# Altium PCB DB36.PcbDoc (part 4 of 6)
Units mm, origin at the board's own origin, x right, y up, seen from the top; angles counter-clockwise.
Board outline 82.2 x 113.2 mm, 8 copper layers (Top Layer, MidLayer1, MidLayer2, GND, MidLayer3, VCC, MidLayer4, Bottom Layer), stack 1.57 mm thick; 185 components, 477 nets, 1727 pads, 1538 vias.
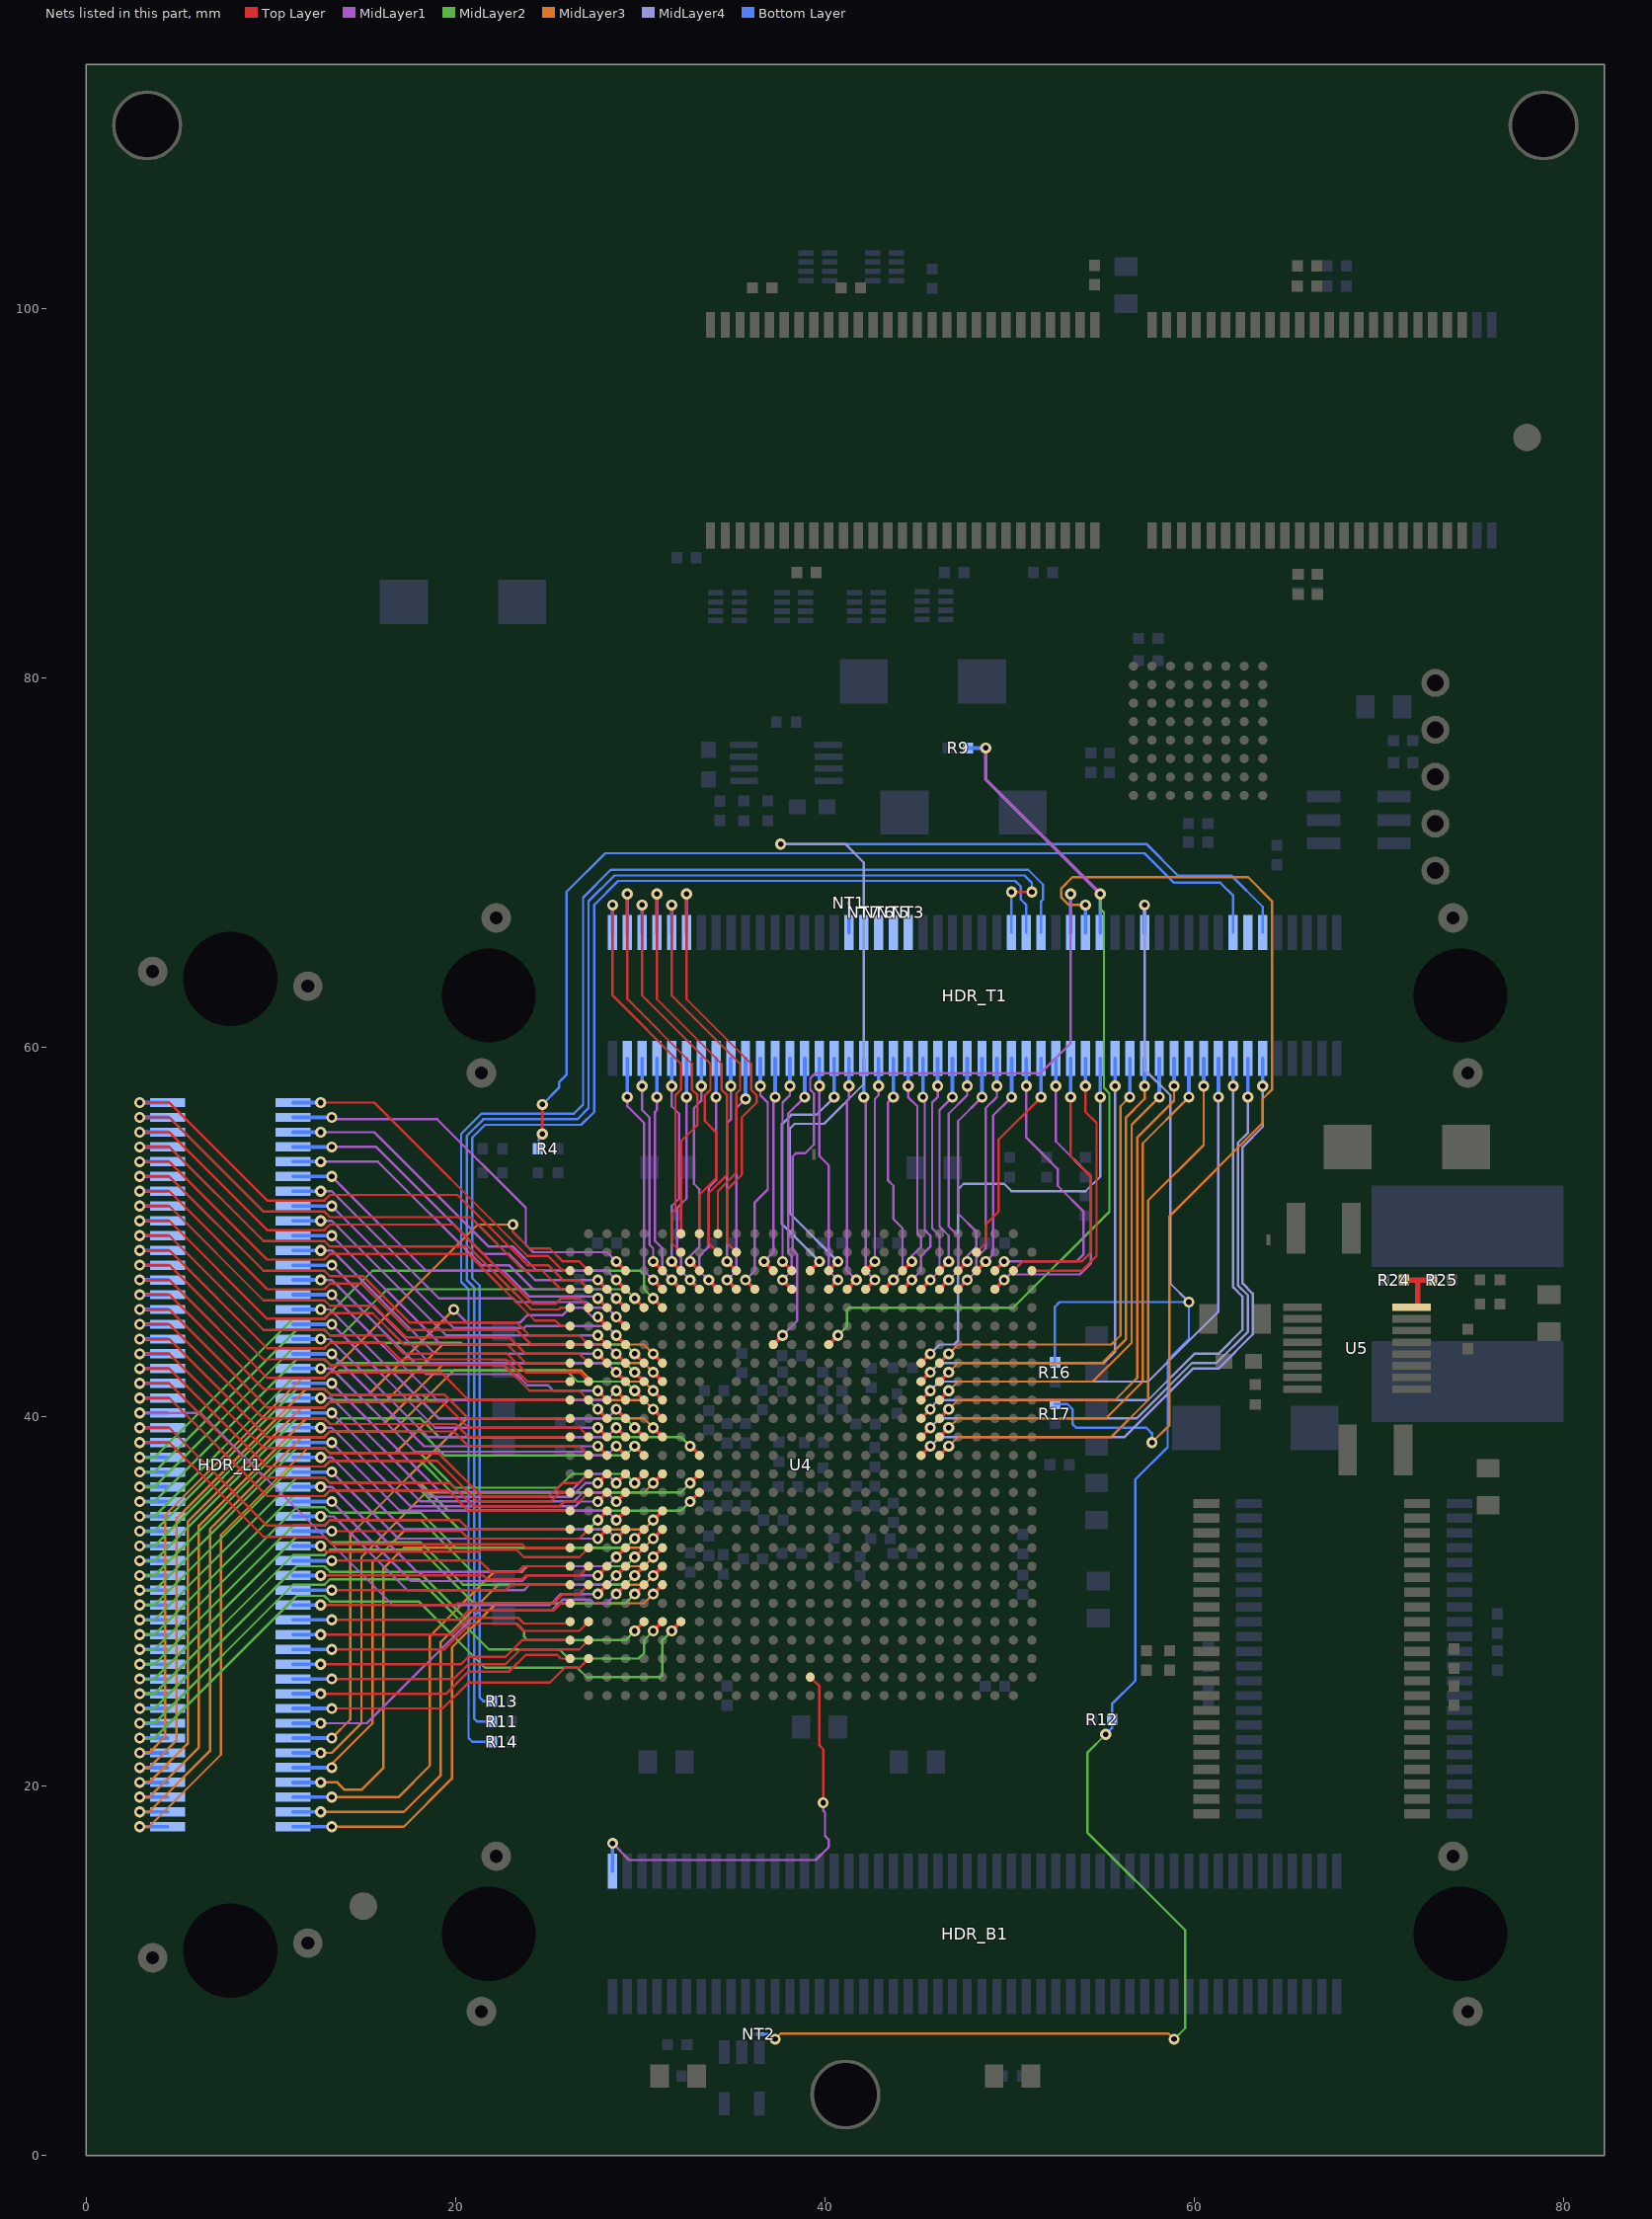
[diagram p10: the nets of this part, all layers, seen from the top]

## Via types
v1: diameter 0.6, hole 0.3, Top Layer to Bottom Layer, 904 vias
v2: diameter 0.6, hole 0.3, Top Layer to Bottom Layer, tented both sides, 506 vias
v3: diameter 0.7, hole 0.4, Top Layer to Bottom Layer, 127 vias
v4: diameter 0.6, hole 0.3, Top Layer to Bottom Layer, tented top, 1 vias

## Nets (pads, with @x,y where several pads share a name; then routed paths per layer and width w, separated by ;. In a path a pad name is that pad's centre, name@x,y a point inside that pad or via, vN(x,y) a via of type N, cw(c..) or ccw(c..) an arc to the next point about the centre after c; other vN are vias at no path point) (continued)
EXTEND_A0: HDR_L1.1 U4.D2 | length 30.2
  Top Layer w0.127: v2(2.9,57) 4.5,57 9.8,51.7 12.9,51.7 13.2,52 20.1,52 23.9,48.2 24.3,48.2 24.6,48.2 25,48.2 25.8,47.4 26.7,47.4 U4.D2@27.2,46.9
  Bottom Layer w0.2: v2(2.9,57) HDR_L1.1@4.4,57
EXTEND_A1: HDR_L1.3 U4.D1 | length 29.1
  Top Layer w0.127: v2(2.9,56.2) 3.9,56.2 ; 3.5,56.2 4.5,56.2 9.6,51.1 12.9,51.1 13.2,50.8 20.8,50.8 23.7,47.9 24.3,47.9 24.6,47.9 24.7,47.9 25.7,46.9 U4.D1@26.2,46.9
  Bottom Layer w0.2: v2(2.9,56.2) HDR_L1.3@4.4,56.2
EXTEND_A2: HDR_L1.5 U4.E2 | length 30.7
  Top Layer w0.127: v2(2.9,55.4) 4,55.4 ; 3.5,55.4 4.5,55.4 9.8,50.1 12.9,50.1 13.2,50.4 19.9,50.4 24.2,46.1 24.3,46.1 24.6,46.1 25.4,46.1 25.7,46.4 26.7,46.4 U4.E2@27.2,45.9
  Bottom Layer w0.2: v2(2.9,55.4) HDR_L1.5@4.4,55.4
EXTEND_A3: HDR_L1.7 U4.E1 | length 28.9
  Top Layer w0.127: v2(2.9,54.6) 3.9,54.6 ; 3.5,54.6 4.5,54.6 9.6,49.5 12.9,49.5 13.2,49.2 20.7,49.2 24.1,45.8 24.3,45.8 24.6,45.8 25.6,45.8 25.7,45.9 U4.E1@26.2,45.9
  Bottom Layer w0.2: v2(2.9,54.6) HDR_L1.7@4.4,54.6
EXTEND_A4: HDR_L1.9 U4.F1 | length 29
  Top Layer w0.127: v2(2.9,53.8) 3.8,53.8 ; 3.5,53.8 4.5,53.8 9.8,48.5 12.9,48.5 13.2,48.8 20.7,48.8 24.3,45.2 24.6,45.2 25.4,45.2 25.7,44.9 U4.F1@26.2,44.9
  Bottom Layer w0.2: v2(2.9,53.8) HDR_L1.9@4.4,53.8
EXTEND_A5: HDR_L1.11 U4.G2 | length 29.9
  Top Layer w0.127: v2(2.9,53) 3.8,53 ; 3.5,53 4.5,53 9.6,47.9 12.9,47.9 13.2,47.6 15,47.6 17.5,45.1 23.3,45.1 23.5,44.9 24,44.4 25.8,44.4 26.7,44.4 U4.G2@27.2,43.9
  Bottom Layer w0.2: v2(2.9,53) HDR_L1.11@4.4,53
EXTEND_A6: HDR_L1.13 U4.G1 | length 28.8
  Top Layer w0.127: v2(2.9,52.2) 3.8,52.2 ; 3.5,52.2 4.5,52.2 9.8,46.9 12.9,46.9 13.2,47.2 14.9,47.2 17.4,44.7 23.3,44.7 24.1,43.9 24.3,43.9 24.6,43.9 U4.G1@26.2,43.9
  Bottom Layer w0.2: v2(2.9,52.2) HDR_L1.13@4.4,52.2
EXTEND_A7: HDR_L1.15 U4.H2 | length 29.6
  Top Layer w0.127: v2(2.9,51.4) 3.8,51.4 ; 3.5,51.4 4.5,51.4 9.6,46.3 12.9,46.3 13.2,46 15.6,46 17.3,44.3 22.9,44.3 23.8,43.4 24.3,43.4 24.6,43.4 26.7,43.4 U4.H2@27.2,42.9
  Bottom Layer w0.2: v2(2.9,51.4) HDR_L1.15@4.4,51.4
EXTEND_A8: HDR_L1.17 U4.H1 | length 28.5
  Top Layer w0.127: v2(2.9,50.6) 3.8,50.6 ; 3.5,50.6 4.5,50.6 9.8,45.3 12.9,45.3 13.2,45.6 15.5,45.6 17.2,43.9 22.8,43.9 23.8,42.9 24.3,42.9 24.6,42.9 U4.H1@26.2,42.9
  Bottom Layer w0.2: v2(2.9,50.6) HDR_L1.17@4.4,50.6
EXTEND_A9: HDR_L1.19 U4.J2 | length 29.4
  Top Layer w0.127: v2(2.9,49.8) 3.8,49.8 ; 3.5,49.8 4.5,49.8 9.6,44.7 12.9,44.7 13.2,44.4 16.2,44.4 17.2,43.4 22.8,43.4 23.8,42.4 24.3,42.4 24.6,42.4 26.7,42.4 U4.J2@27.2,41.9
  Bottom Layer w0.2: v2(2.9,49.8) HDR_L1.19@4.4,49.8
EXTEND_A10: HDR_L1.21 U4.J1 | length 28.3
  Top Layer w0.127: v2(2.9,49) 3.8,49 ; 3.5,49 4.5,49 9.8,43.7 12.9,43.7 13.2,44 16.1,44 17,43.1 22.7,43.1 23.9,41.9 24.3,41.9 24.6,41.9 U4.J1@26.2,41.9
  Bottom Layer w0.2: v2(2.9,49) HDR_L1.21@4.4,49
EXTEND_A11: HDR_L1.23 U4.K2 | length 29.1
  Top Layer w0.127: v2(2.9,48.2) 3.8,48.2 ; 3.5,48.2 4.5,48.2 9.6,43.1 12.9,43.1 13.2,42.8 22.6,42.8 24,41.4 24.3,41.4 24.6,41.4 26.7,41.4 U4.K2@27.2,40.9
  Bottom Layer w0.2: v2(2.9,48.2) HDR_L1.23@4.4,48.2
EXTEND_A12: HDR_L1.25 U4.K1 | length 27.7
  Top Layer w0.127: v2(2.9,47.4) 4.5,47.4 9.8,42.1 12.9,42.1 13.2,42.4 19.2,42.4 20.7,40.9 24.3,40.9 24.6,40.9 U4.K1@26.2,40.9
  Bottom Layer w0.2: v2(2.9,47.4) HDR_L1.25@4.4,47.4
EXTEND_A13: HDR_L1.27 U4.L1 | length 27.6
  Top Layer w0.127: v2(2.9,46.6) 4.5,46.6 9.6,41.5 12.9,41.5 13.2,41.2 19.4,41.2 20.7,39.9 24.3,39.9 24.6,39.9 U4.L1@26.2,39.9
  Bottom Layer w0.2: v2(2.9,46.6) HDR_L1.27@4.4,46.6
EXTEND_A14: HDR_L1.29 U4.M2 | length 28.9
  Top Layer w0.127: v2(2.9,45.8) 4.5,45.8 9.8,40.5 12.9,40.5 13.2,40.8 19.3,40.8 20.7,39.4 24.3,39.4 24.6,39.4 26.7,39.4 U4.M2@27.2,38.9
  Bottom Layer w0.2: v2(2.9,45.8) HDR_L1.29@4.4,45.8
EXTEND_A15: HDR_L1.31 U4.M1 | length 27.3
  Top Layer w0.127: v2(2.9,45) 4.5,45 9.6,39.9 12.9,39.9 13.2,39.6 20,39.6 20.7,38.9 24.3,38.9 24.6,38.9 U4.M1@26.2,38.9
  Bottom Layer w0.2: v2(2.9,45) HDR_L1.31@4.4,45
EXTEND_A16: HDR_L1.33 U4.N2 | length 28.7
  Top Layer w0.127: v2(2.9,44.2) 4.5,44.2 9.8,38.9 12.9,38.9 13.2,39.2 19.9,39.2 20.7,38.4 24.3,38.4 24.6,38.4 26.7,38.4 U4.N2@27.2,37.9
  Bottom Layer w0.2: v2(2.9,44.2) HDR_L1.33@4.4,44.2
EXTEND_A17: HDR_L1.35 U4.P2 | length 29.5
  Top Layer w0.127: v2(2.9,43.4) 4.5,43.4 9.6,38.3 12.9,38.3 13.2,38 19.1,38 21.438,35.662 25.046,35.662 25.784,36.4 26.7,36.4 U4.P2@27.2,36.9
  Bottom Layer w0.2: v2(2.9,43.4) HDR_L1.35@4.4,43.4
EXTEND_A18: HDR_L1.37 U4.R1 | length 28.2
  Top Layer w0.127: v2(2.9,42.6) 4.5,42.6 9.8,37.3 12.9,37.3 13.2,37.6 19,37.6 20.7,35.9 21.192,35.408 25.151,35.408 25.643,35.9 U4.R1@26.2,35.9
  Bottom Layer w0.2: v2(2.9,42.6) HDR_L1.37@4.4,42.6
EXTEND_A19: HDR_L1.39 U4.R2 | length 28.9
  Top Layer w0.127: v2(2.9,41.8) 4.5,41.8 9.6,36.7 12.9,36.7 13.2,36.4 19.7,36.4 20.946,35.154 25.654,35.154 25.9,35.4 26.7,35.4 U4.R2@27.2,35.9
  Bottom Layer w0.2: v2(2.9,41.8) HDR_L1.39@4.4,41.8
EXTEND_A20: HDR_L1.41 U4.T1 | length 27.6
  Top Layer w0.127: v2(2.9,41) 4.5,41 9.8,35.7 12.9,35.7 13.2,36 19.6,36 20.7,34.9 24.3,34.9 24.6,34.9 U4.T1@26.2,34.9
  Bottom Layer w0.2: v2(2.9,41) HDR_L1.41@4.4,41
EXTEND_A21: HDR_L1.43 U4.Y3 | length 31.6
  Top Layer w0.2: v1(27.7,30.4) U4.Y3@28.2,30.9
  MidLayer1 w0.127: v2(2.9,40.2) 6.2,40.2 16.6,29.8 24.3,29.8 24.6,29.8 25.1,29.8 25.7,30.4 v1(27.7,30.4)
  Bottom Layer w0.2: v2(2.9,40.2) HDR_L1.43@4.4,40.2
EXTEND_A22: HDR_L1.45 U4.U1 | length 27.3
  Top Layer w0.127: v2(2.9,39.4) 4.5,39.4 9.8,34.1 12.9,34.1 13.2,34.4 20.2,34.4 20.7,33.9 24.3,33.9 24.6,33.9 U4.U1@26.2,33.9
  Bottom Layer w0.2: v2(2.9,39.4) HDR_L1.45@4.4,39.4
EXTEND_A23: HDR_L1.47 U4.V1 | length 27.5
  Top Layer w0.127: v2(2.9,38.6) 3.8,38.6 ; 3.5,38.6 4.5,38.6 9.6,33.5 12.9,33.5 13.3,33.1 23.6,33.1 23.8,32.9 24.3,32.9 24.6,32.9 U4.V1@26.2,32.9
  Bottom Layer w0.2: v2(2.9,38.6) HDR_L1.47@4.4,38.6
EXTEND_A24: HDR_L1.49 U4.E6 | length 35.3
  Top Layer w0.2: v1(30.7,46.4) U4.E6@31.2,45.9
  MidLayer2 w0.127: v2(2.9,37.8) 3.7,37.8 11.2,45.3 12.9,45.3 14,46.4 15.5,47.9 24.3,47.9 24.6,47.9 30,47.9 30.2,47.7 30.2,46.9 v1(30.7,46.4)
  Bottom Layer w0.2: v2(2.9,37.8) HDR_L1.49@4.4,37.8
EXTEND_A25: HDR_L1.51 U4.E5 | length 33.6
  Top Layer w0.2: v1(29.7,46.4) U4.E5@30.2,45.9
  MidLayer2 w0.127: v2(2.9,37) 3.7,37 11.4,44.7 12.9,44.7 13.2,44.4 13.8,44.4 15.4,46 16.3,46.9 24.3,46.9 24.6,46.9 29.2,46.9 v1(29.7,46.4)
  Bottom Layer w0.2: v2(2.9,37) HDR_L1.51@4.4,37
EXTEND_A26: HDR_L1.53 U4.H5 | length 32.5
  Top Layer w0.2: v1(29.7,43.4) U4.H5@30.2,42.9
  MidLayer2 w0.127: v2(2.9,36.2) 3.7,36.2 11.2,43.7 12.9,43.7 13.2,44 20.3,44 20.4,43.9 24.3,43.9 24.6,43.9 29.2,43.9 v1(29.7,43.4)
  Bottom Layer w0.2: v2(2.9,36.2) HDR_L1.53@4.4,36.2
EXTEND_A27: HDR_L1.55 U4.J5 | length 32.6
  Top Layer w0.2: v1(29.7,42.4) U4.J5@30.2,41.9
  MidLayer2 w0.127: v2(2.9,35.4) 3.7,35.4 11.4,43.1 12.9,43.1 13.2,42.8 13.5,42.8 13.6,42.9 24.3,42.9 24.6,42.9 29.2,42.9 v1(29.7,42.4)
  Bottom Layer w0.2: v2(2.9,35.4) HDR_L1.55@4.4,35.4
EXTEND_A28: HDR_L1.57 U4.K5 | length 32.7
  Top Layer w0.2: v1(29.7,41.4) U4.K5@30.2,40.9
  MidLayer2 w0.127: v2(2.9,34.6) 3.7,34.6 11.2,42.1 12.9,42.1 13.2,42.4 13.6,42.4 13.7,42.5 24.3,42.5 24.6,42.5 26,42.5 26.6,41.9 29.2,41.9 v1(29.7,41.4)
  Bottom Layer w0.2: v2(2.9,34.6) HDR_L1.57@4.4,34.6
EXTEND_A29: HDR_L1.59 U4.L3 | length 30.8
  Top Layer w0.2: v1(27.7,40.4) U4.L3@28.2,39.9
  MidLayer2 w0.127: v2(2.9,33.8) 3.7,33.8 11.4,41.5 12.9,41.5 13.2,41.2 18.2,41.2 18.5,40.9 24.3,40.9 24.6,40.9 27.2,40.9 v1(27.7,40.4)
  Bottom Layer w0.2: v2(2.9,33.8) HDR_L1.59@4.4,33.8
  Bottom Layer w0.381: v1(27.7,40.4) v1@27.7,40.508
EXTEND_A30: HDR_L1.61 U4.M5 | length 32.9
  Top Layer w0.2: v1(29.7,39.4) U4.M5@30.2,38.9
  MidLayer2 w0.127: v2(2.9,33) 3.7,33 11.2,40.5 12.9,40.5 13.3,40.9 18.1,40.9 19.1,39.9 24.3,39.9 24.6,39.9 29.2,39.9 v1(29.7,39.4)
  Bottom Layer w0.2: v2(2.9,33) HDR_L1.61@4.4,33
EXTEND_A31: HDR_L1.63 U4.N8 | length 36.1
  Top Layer w0.2: v1@32.7,38.475 32.737,38.432 U4.N8@33.2,37.9
  MidLayer2 w0.127: v2(2.9,32.2) 3.7,32.2 11.4,39.9 12.9,39.9 13.2,39.6 13.5,39.6 13.8,39.9 18.1,39.9 19.1,38.9 24.3,38.9 24.6,38.9 32.2,38.9 v1(32.7,38.4)
  Bottom Layer w0.2: v2(2.9,32.2) HDR_L1.63@4.4,32.2
EXTEND_A32: HDR_L1.65 U4.N5 | length 33
  Top Layer w0.2: v1(29.7,38.4) U4.N5@30.2,37.9
  MidLayer2 w0.127: v2(2.9,31.4) 3.7,31.4 11.2,38.9 12.9,38.9 13.2,39.2 18.1,39.2 19.4,37.9 24.3,37.9 24.6,37.9 29.2,37.9 v1(29.7,38.4)
  Bottom Layer w0.2: v2(2.9,31.4) HDR_L1.65@4.4,31.4
EXTEND_A33: HDR_L1.67 U4.P5 | length 33.6
  Top Layer w0.2: v1(29.7,36.4) U4.P5@30.2,36.9
  MidLayer2 w0.127: v2(2.9,30.6) 3.7,30.6 11.4,38.3 12.9,38.3 13.2,38 18.1,38 19.946,36.154 25.554,36.154 26.3,36.9 29.2,36.9 v1(29.7,36.4)
  Bottom Layer w0.2: v2(2.9,30.6) HDR_L1.67@4.4,30.6
EXTEND_A34: HDR_L1.69 U4.P8 | length 36.1
  Top Layer w0.2: v1(32.7,36.4) U4.P8@33.2,36.9
  MidLayer2 w0.127: v2(2.9,29.8) 3.7,29.8 11.2,37.3 12.9,37.3 13.2,37.6 18.1,37.6 19.8,35.9 24.3,35.9 24.6,35.9 32.2,35.9 v1(32.7,36.4)
  Bottom Layer w0.2: v2(2.9,29.8) HDR_L1.69@4.4,29.8
EXTEND_A35: HDR_L1.71 U4.R8 | length 36.1
  Top Layer w0.2: v1(32.7,35.4) U4.R8@33.2,35.9
  MidLayer2 w0.127: v2(2.9,29) 3.7,29 11.4,36.7 12.9,36.7 13.2,36.4 18.1,36.4 19.6,34.9 24.3,34.9 24.6,34.9 32.2,34.9 v1(32.7,35.4)
  Bottom Layer w0.2: v2(2.9,29) HDR_L1.71@4.4,29
EXTEND_A36: HDR_L1.73 U4.T3 | length 31.4
  Top Layer w0.2: v1(27.7,34.4) U4.T3@28.2,34.9
  MidLayer2 w0.127: v2(2.9,28.2) 3.7,28.2 11.2,35.7 12.9,35.7 13.2,36 18.1,36 20.2,33.9 24.3,33.9 24.6,33.9 27.2,33.9 v1(27.7,34.4)
  Bottom Layer w0.2: v2(2.9,28.2) HDR_L1.73@4.4,28.2
  Bottom Layer w0.381: v1(27.7,34.4) v1@27.7,34.508
EXTEND_A37: HDR_L1.75 U4.U5 | length 33.3
  Top Layer w0.2: v1(29.7,33.4) U4.U5@30.2,33.9
  MidLayer2 w0.127: v2(2.9,27.4) 3.7,27.4 11.4,35.1 12.9,35.1 13.2,34.8 18.1,34.8 20,32.9 24.3,32.9 24.6,32.9 29.2,32.9 v1(29.7,33.4)
  Bottom Layer w0.2: v2(2.9,27.4) HDR_L1.75@4.4,27.4
EXTEND_A38: HDR_L1.77 U4.V5 | length 33.7
  Top Layer w0.2: v1(29.7,32.4) U4.V5@30.2,32.9
  MidLayer2 w0.127: v2(2.9,26.6) 3.7,26.6 11.2,34.1 12.9,34.1 13.2,34.4 18.1,34.4 20.9,31.6 23.4,31.6 23.7,31.9 24.3,31.9 24.6,31.9 29.2,31.9 v1(29.7,32.4)
  Bottom Layer w0.2: v2(2.9,26.6) HDR_L1.77@4.4,26.6
EXTEND_A39: HDR_L1.79 U4.W5 | length 33.5
  Top Layer w0.2: v1(29.7,31.4) U4.W5@30.2,31.9
  MidLayer2 w0.127: v2(2.9,25.8) 3.7,25.8 11.4,33.5 12.9,33.5 13.2,33.2 18.1,33.2 20.4,30.9 24.3,30.9 24.6,30.9 29.2,30.9 v1(29.7,31.4)
  Bottom Layer w0.2: v2(2.9,25.8) HDR_L1.79@4.4,25.8
EXTEND_A40: HDR_L1.81 U4.Y5 | length 33.6
  Top Layer w0.2: v1(29.7,30.4) U4.Y5@30.2,30.9
  MidLayer2 w0.127: v2(2.9,25) 3.7,25 11.2,32.5 12.9,32.5 13.2,32.8 18.1,32.8 21,29.9 24.3,29.9 24.6,29.9 29.2,29.9 v1(29.7,30.4)
  Bottom Layer w0.2: v2(2.9,25) HDR_L1.81@4.4,25
EXTEND_A41: HDR_L1.83 U4.AB5 | length 34.2
  Top Layer w0.2: v1(29.7,28.4) U4.AB5@30.2,28.9
  MidLayer2 w0.127: v2(2.9,24.2) 3.7,24.2 11.4,31.9 12.9,31.9 13.2,31.6 18,31.6 20.8,28.8 23.3,28.8 23.7,28.4 23.7,28.1 23.9,27.9 24.3,27.9 24.6,27.9 29.2,27.9 v1(29.7,28.4)
  Bottom Layer w0.2: v2(2.9,24.2) HDR_L1.83@4.4,24.2
EXTEND_A42: HDR_L1.85 U4.AB6 | length 36.1
  Top Layer w0.2: v1(30.7,28.4) U4.AB6@31.2,28.9
  MidLayer2 w0.127: v2(2.9,23.4) 3.7,23.4 11.2,30.9 12.9,30.9 13.2,31.2 18,31.2 21.8,27.4 24.3,27.4 24.6,27.4 25.625,27.4 26.125,26.9 29.9,26.9 30.2,27.2 30.2,27.9 v1(30.7,28.4)
  Bottom Layer w0.2: v2(2.9,23.4) HDR_L1.85@4.4,23.4
EXTEND_A43: HDR_L1.87 U4.AB7 | length 38.2
  Top Layer w0.2: v1(31.7,28.4) U4.AB7@32.2,28.9
  MidLayer2 w0.127: v2(2.9,22.6) 3.7,22.6 11.4,30.3 12.9,30.3 13.2,30 18,30 21.6,26.4 24.3,26.4 24.6,26.4 26.6,26.4 27.1,25.9 31.1,25.9 31.2,26 31.2,27.9 v1(31.7,28.4)
  Bottom Layer w0.2: v2(2.9,22.6) HDR_L1.87@4.4,22.6
EXTEND_A44: HDR_L1.89 U4.C2 | length 45.9
  Top Layer w0.127: v1(23.1,50.4) 23.1,50 24,49.1 24.3,49.1 24.6,49.1 25.1,49.1 25.8,48.4 26.7,48.4 U4.C2@27.2,47.9
  MidLayer3 w0.127: v2(2.9,21.8) 3.4,21.8 4.277,22.677 4.277,34.677 11.7,42.1 12.9,42.1 21.2,50.4 v1(23.1,50.4)
  Bottom Layer w0.2: v2(2.9,21.8) HDR_L1.89@4.4,21.8
EXTEND_A45: HDR_L1.91 U4.F3 | length 45.4
  Top Layer w0.2: v1(27.7,45.4) U4.F3@28.2,44.9
  MidLayer1 w0.127: v1(19.9,45.8) 20.6,45.1 23.5,45.1 23.9,45.5 24.3,45.5 24.6,45.5 25.8,45.5 26.2,45.9 26.9,45.9 27.4,45.4 v1(27.7,45.4)
  MidLayer3 w0.127: v2(2.9,21) 3.4,21 4.9,22.5 4.9,34.5 11.9,41.5 12.9,41.5 13.2,41.2 15.3,41.2 v1(19.9,45.8)
  Bottom Layer w0.2: v2(2.9,21) HDR_L1.91@4.4,21
EXTEND_A46: HDR_L1.93 U4.H6 | length 47.1
  Top Layer w0.2: v1(30.7,43.4) U4.H6@31.2,42.9
  MidLayer3 w0.127: v2(2.9,20.2) 3.4,20.2 5.5,22.3 5.5,34.3 11.7,40.5 12.9,40.5 13.2,40.8 16.2,40.8 19.3,43.9 24.3,43.9 24.6,43.9 30.2,43.9 v1(30.7,43.4)
  Bottom Layer w0.2: v2(2.9,20.2) HDR_L1.93@4.4,20.2
EXTEND_A47: HDR_L1.95 U4.J6 | length 47.2
  Top Layer w0.2: v1(30.7,42.4) U4.J6@31.2,41.9
  MidLayer3 w0.127: v2(2.9,19.4) 3.4,19.4 6.1,22.1 6.1,34.1 11.9,39.9 12.9,39.9 13.2,39.6 16.1,39.6 19.4,42.9 24.3,42.9 24.6,42.9 30.2,42.9 v1(30.7,42.4)
  Bottom Layer w0.2: v2@2.9,19.4 HDR_L1.95@4.4,19.4
EXTEND_A48: HDR_L1.97 U4.K6 | length 47.4
  Top Layer w0.2: v1(30.7,41.4) U4.K6@31.2,40.9
  MidLayer3 w0.127: v2(2.9,18.6) 3.4,18.6 6.7,21.9 6.7,33.9 11.7,38.9 12.912,38.9 12.912,38.912 13.2,39.2 16.6,39.2 19.9,42.5 24.3,42.5 24.6,42.5 26.8,42.5 27.4,41.9 30.2,41.9 v1(30.7,41.4)
  Bottom Layer w0.2: v2(2.9,18.6) HDR_L1.97@4.4,18.6
EXTEND_A49: HDR_L1.99 U4.L6 | length 47
  Top Layer w0.2: v1(30.7,40.4) U4.L6@31.2,39.9
  MidLayer3 w0.127: v2(2.9,17.8) 3.4,17.8 7.3,21.7 7.3,33.6 12,38.3 12.9,38.3 13.2,38 16.7,38 19.6,40.9 24.3,40.9 24.6,40.9 30.2,40.9 v1(30.7,40.4)
  Bottom Layer w0.2: v2(2.9,17.8) HDR_L1.99@4.4,17.8
EXTEND_B0: HDR_L1.2 U4.C1 | length 18.8
  Top Layer w0.127: v2(12.7,57) 15.6,57 23.9,48.7 24.3,48.7 24.6,48.7 25,48.7 25.8,47.9 U4.C1@26.2,47.9
  Bottom Layer w0.2: HDR_L1.2@11.2,57 v2(12.7,57)
EXTEND_B1: HDR_L1.4 U4.C4 | length 22.6
  Top Layer w0.2: v1(28.7,48.4) U4.C4@29.2,47.9
  MidLayer1 w0.127: v2(13.3,56.2) 13.4,56.2 13.5,56.1 19,56.1 23.8,51.3 23.8,49.3 24.2,48.9 28.2,48.9 v1(28.7,48.4)
  Bottom Layer w0.2: HDR_L1.4@11.2,56.2 v2(13.3,56.2)
EXTEND_B2: HDR_L1.6 U4.D4 | length 21.5
  Top Layer w0.2: v1(28.7,47.4) U4.D4@29.2,46.9
  MidLayer1 w0.127: v2(12.7,55.4) 15.6,55.4 21.8,49.2 23.1,49.2 24.4,47.9 28.2,47.9 v1(28.7,47.4)
  Bottom Layer w0.2: HDR_L1.6@11.2,55.4 v2(12.7,55.4)
EXTEND_B3: HDR_L1.8 U4.D3 | length 20.2
  Top Layer w0.2: v1(27.7,47.4) U4.D3@28.2,46.9
  MidLayer1 w0.127: v2(13.3,54.6) 15.7,54.6 21.5,48.8 22.9,48.8 24.3,47.4 v1(27.7,47.4)
  Bottom Layer w0.2: HDR_L1.8@11.2,54.6 v2(13.3,54.6)
EXTEND_B4: HDR_L1.10 U4.E4 | length 21.3
  Top Layer w0.2: v1(28.7,46.4) U4.E4@29.2,45.9
  MidLayer1 w0.127: v2(12.7,53.8) 15.8,53.8 21.4,48.2 22.9,48.2 24.2,46.9 28.2,46.9 v1(28.7,46.4)
  Bottom Layer w0.2: HDR_L1.10@11.2,53.8 v2(12.7,53.8)
EXTEND_B5: HDR_L1.12 U4.E3 | length 19.9
  Top Layer w0.2: v1(27.7,46.4) U4.E3@28.2,45.9
  MidLayer1 w0.127: v2(13.3,53) 18.4,47.9 22.6,47.9 24,46.5 27.6,46.5 v1(27.7,46.4)
  Bottom Layer w0.2: HDR_L1.12@11.2,53 v2(13.3,53)
EXTEND_B6: HDR_L1.14 U4.F4 | length 21
  Top Layer w0.2: v1(28.7,45.4) U4.F4@29.2,44.9
  MidLayer1 w0.127: v2(12.7,52.2) 13.3,52.2 19.1,46.4 23.1,46.4 23.3,46.2 24.3,46.2 24.6,46.2 27.1,46.2 27.4,45.9 28.2,45.9 v1(28.7,45.4)
  Bottom Layer w0.2: HDR_L1.14@11.2,52.2 v2(12.7,52.2)
EXTEND_B7: HDR_L1.16 U4.G4 | length 21.2
  Top Layer w0.2: v1(28.7,44.4) U4.G4@29.2,43.9
  MidLayer1 w0.127: v2(13.3,51.4) 19.9,44.8 23.7,44.8 23.8,44.9 24.3,44.9 24.6,44.9 28.2,44.9 v1(28.7,44.4)
  Bottom Layer w0.2: HDR_L1.16@11.2,51.4 v2(13.3,51.4)
EXTEND_B8: HDR_L1.18 U4.G3 | length 19.8
  Top Layer w0.127: v1(27.7,44.4) U4.G3@28.2,43.9
  MidLayer1 w0.127: v2(12.7,50.6) 13.3,50.6 19.5,44.4 24.3,44.4 24.6,44.4 v1(27.7,44.4)
  Bottom Layer w0.2: HDR_L1.18@11.2,50.6 v2(12.7,50.6)
EXTEND_B9: HDR_L1.20 U4.H4 | length 23.8
  Top Layer w0.2: v1(28.7,43.4) U4.H4@29.2,42.9
  MidLayer1 w0.127: v2(13.3,49.8) 19.2,43.9 24.3,43.9 24.6,43.9 28.2,43.9 ; 25.3,43.9 28.2,43.9 ; v1(28.7,43.4) 28.2,43.9
  Bottom Layer w0.2: HDR_L1.20@11.2,49.8 v2(13.3,49.8)
EXTEND_B10: HDR_L1.22 U4.H3 | length 19.5
  Top Layer w0.2: v1(27.7,43.4) U4.H3@28.2,42.9
  MidLayer1 w0.127: v2(12.7,49) 13.3,49 18.9,43.4 24.3,43.4 24.6,43.4 v1(27.7,43.4)
  Bottom Layer w0.2: HDR_L1.22@11.2,49 v2(12.7,49)
EXTEND_B11: HDR_L1.24 U4.J4 | length 20.6
  Top Layer w0.2: v1(28.7,42.4) U4.J4@29.2,41.9
  MidLayer1 w0.127: v2(13.3,48.2) 18.6,42.9 24.3,42.9 24.6,42.9 28.2,42.9 v1(28.7,42.4)
  Bottom Layer w0.2: HDR_L1.24@11.2,48.2 v2(13.3,48.2)
EXTEND_B12: HDR_L1.26 U4.K3 | length 19.7
  Top Layer w0.2: v1(27.7,41.4) U4.K3@28.2,40.9
  MidLayer1 w0.127: v2(12.7,47.4) 13.3,47.4 18.4,42.3 23.3,42.3 23.9,41.7 24.3,41.7 24.6,41.7 25,41.7 25.3,41.4 v1(27.7,41.4)
  Bottom Layer w0.2: HDR_L1.26@11.2,47.4 v2(12.7,47.4)
EXTEND_B13: HDR_L1.28 U4.K4 | length 20.8
  Top Layer w0.2: v1(28.7,41.4) U4.K4@29.2,40.9
  MidLayer1 w0.127: v2(13.3,46.6) 19,40.9 24.3,40.9 24.6,40.9 25.3,40.9 28.2,40.9 v1(28.7,41.4)
  Bottom Layer w0.2: HDR_L1.28@11.2,46.6 v2(13.3,46.6)
EXTEND_B14: HDR_L1.30 U4.L4 | length 20.9
  Top Layer w0.2: v1(28.7,40.4) U4.L4@29.2,39.9
  MidLayer1 w0.127: v2(12.7,45.8) 13.2,45.8 19.1,39.9 24.3,39.9 24.6,39.9 28.2,39.9 v1(28.7,40.4)
  Bottom Layer w0.2: HDR_L1.30@11.2,45.8 v2(12.7,45.8)
EXTEND_B15: HDR_L1.32 U4.M3 | length 19.5
  Top Layer w0.2: v1(27.7,39.4) U4.M3@28.2,38.9
  MidLayer1 w0.127: v2(13.3,45) 18.9,39.4 24.3,39.4 24.6,39.4 v1(27.7,39.4)
  Bottom Layer w0.2: HDR_L1.32@11.2,45 v2(13.3,45)
EXTEND_B16: HDR_L1.34 U4.M4 | length 20.6
  Top Layer w0.2: v1(28.7,39.4) U4.M4@29.2,38.9
  MidLayer1 w0.127: v2(12.7,44.2) 13.2,44.2 18.5,38.9 24.3,38.9 24.6,38.9 28.2,38.9 v1(28.7,39.4)
  Bottom Layer w0.2: HDR_L1.34@11.2,44.2 v2(12.7,44.2)
EXTEND_B17: HDR_L1.36 U4.N3 | length 19.3
  Top Layer w0.2: v1(27.7,38.4) U4.N3@28.2,37.9
  MidLayer1 w0.127: v2(13.3,43.4) 18.3,38.4 24.3,38.4 24.6,38.4 v1(27.7,38.4)
  Bottom Layer w0.2: HDR_L1.36@11.2,43.4 v2(13.3,43.4)
EXTEND_B18: HDR_L1.38 U4.N4 | length 20.4
  Top Layer w0.2: v1(28.7,38.4) U4.N4@29.2,37.9
  MidLayer1 w0.127: v2(12.7,42.6) 13.3,42.6 17.8,38.1 24.3,38.1 24.6,38.1 27.2,38.1 27.4,37.9 28.2,37.9 v1(28.7,38.4)
  Bottom Layer w0.2: HDR_L1.38@11.2,42.6 v2(12.7,42.6)
EXTEND_B19: HDR_L1.40 U4.P4 | length 21.3
  Top Layer w0.2: v1(28.7,36.4) U4.P4@29.2,36.9
  MidLayer1 w0.127: v2(13.3,41.8) 19.184,35.916 26.184,35.916 27.168,36.9 28.2,36.9 v1(28.7,36.4)
  Bottom Layer w0.2: HDR_L1.40@11.2,41.8 v2(13.3,41.8)
EXTEND_B20: HDR_L1.42 U4.P3 | length 19.7
  Top Layer w0.2: v1(27.7,36.4) U4.P3@28.2,36.9
  MidLayer1 w0.127: v2(12.7,41) 13.3,41 18.638,35.662 26.29,35.662 27.027,36.4 v1(27.7,36.4)
  Bottom Layer w0.2: HDR_L1.42@11.2,41 v2(12.7,41)
EXTEND_B21: HDR_L1.44 U4.R4 | length 20.6
  Top Layer w0.2: v1(28.7,35.4) U4.R4@29.2,35.9
  MidLayer1 w0.127: v2(13.3,40.2) 18.092,35.408 26.395,35.408 26.887,35.9 28.2,35.9 v1(28.7,35.4)
  Bottom Layer w0.2: HDR_L1.44@11.2,40.2 v2(13.3,40.2)
EXTEND_B22: HDR_L1.46 U4.R3 | length 19.1
  Top Layer w0.2: v1(27.7,35.4) U4.R3@28.2,35.9
  MidLayer1 w0.127: v2(12.7,39.4) 13.3,39.4 17.546,35.154 26.5,35.154 26.746,35.4 v1(27.7,35.4)
  Bottom Layer w0.2: HDR_L1.46@11.2,39.4 v2(12.7,39.4)
EXTEND_B23: HDR_L1.48 U4.T4 | length 19.9
  Top Layer w0.2: v1(28.7,34.4) U4.T4@29.2,34.9
  MidLayer1 w0.127: v2(13.3,38.6) 17,34.9 24.3,34.9 24.6,34.9 28.2,34.9 v1(28.7,34.4)
  Bottom Layer w0.2: HDR_L1.48@11.2,38.6 v2(13.3,38.6)
EXTEND_B24: HDR_L1.50 U4.U4 | length 20
  Top Layer w0.2: v1(28.7,33.4) U4.U4@29.2,33.9
  MidLayer1 w0.127: v2(12.7,37.8) 13.3,37.8 17.2,33.9 24.3,33.9 24.6,33.9 25.3,33.9 28.2,33.9 v1(28.7,33.4)
  Bottom Layer w0.2: HDR_L1.50@11.2,37.8 v2(12.7,37.8)
EXTEND_B25: HDR_L1.52 U4.U3 | length 18.7
  Top Layer w0.2: v1(27.7,33.4) U4.U3@28.2,33.9
  MidLayer1 w0.127: v2(13.3,37) 16.9,33.4 24.3,33.4 24.6,33.4 25.3,33.4 v1(27.7,33.4)
  Bottom Layer w0.2: HDR_L1.52@11.2,37 v2(13.3,37)
EXTEND_B26: HDR_L1.54 U4.V4 | length 20.4
  Top Layer w0.2: v1(28.7,32.4) U4.V4@29.2,32.9
  MidLayer1 w0.127: v2(12.7,36.2) 13.3,36.2 17.9,31.6 23.5,31.6 23.8,31.9 24.3,31.9 24.6,31.9 28.2,31.9 v1(28.7,32.4)
  Bottom Layer w0.2: HDR_L1.54@11.2,36.2 v2(12.7,36.2)
EXTEND_B27: HDR_L1.56 U4.W3 | length 19.1
  Top Layer w0.2: v1(27.7,31.4) U4.W3@28.2,31.9
  MidLayer1 w0.127: v2(13.3,35.4) 17.6,31.1 23.6,31.1 23.9,31.4 24.3,31.4 24.6,31.4 v1(27.7,31.4)
  Bottom Layer w0.2: HDR_L1.56@11.2,35.4 v2(13.3,35.4)
EXTEND_B28: HDR_L1.58 U4.W4 | length 23.1
  Top Layer w0.2: v1(28.7,31.4) U4.W4@29.2,31.9
  MidLayer1 w0.127: v2(12.7,34.6) 13.4,34.6 17.4,30.6 23.7,30.6 24,30.9 24.3,30.9 24.6,30.9 28.2,30.9 ; 25.3,30.9 28.2,30.9 ; v1(28.7,31.4) 28.2,30.9
  Bottom Layer w0.2: HDR_L1.58@11.2,34.6 v2(12.7,34.6)
EXTEND_B29: HDR_L1.60 U4.U2 | length 16.4
  Top Layer w0.127: v2(13.3,33.8) 20.3,33.8 20.7,33.4 24.3,33.4 24.6,33.4 26.7,33.4 U4.U2@27.2,33.9
  Bottom Layer w0.2: HDR_L1.60@11.2,33.8 v2(13.3,33.8)
EXTEND_B30: HDR_L1.62 U4.V2 | length 16.5
  Top Layer w0.127: v2(12.7,33) 13,32.7 21.3,32.7 21.4,32.8 23.3,32.8 23.7,32.4 24.3,32.4 24.6,32.4 26.7,32.4 U4.V2@27.2,32.9
  Bottom Layer w0.2: HDR_L1.62@11.2,33 v2(12.7,33)
EXTEND_B31: HDR_L1.64 U4.W1 | length 15.4
  Top Layer w0.127: v2(13.3,32.2) 21.3,32.2 21.9,31.6 23.4,31.6 23.7,31.9 24.3,31.9 24.6,31.9 U4.W1@26.2,31.9
  Bottom Layer w0.2: HDR_L1.64@11.2,32.2 v2(13.3,32.2)
EXTEND_B32: HDR_L1.66 U4.W2 | length 16.4
  Top Layer w0.127: v2(12.7,31.4) 21.5,31.4 21.7,31.2 23.6,31.2 23.8,31.4 24.3,31.4 24.6,31.4 26.7,31.4 U4.W2@27.2,31.9
  Bottom Layer w0.2: HDR_L1.66@11.2,31.4 v2(12.7,31.4)
EXTEND_B33: HDR_L1.68 U4.Y1 | length 15.1
  Top Layer w0.127: v2(13.3,30.6) 22.7,30.6 23,30.9 24.3,30.9 24.6,30.9 U4.Y1@26.2,30.9
  Bottom Layer w0.2: HDR_L1.68@11.2,30.6 v2(13.3,30.6)
EXTEND_B34: HDR_L1.70 U4.Y2 | length 16.5
  Top Layer w0.127: v2(12.7,29.8) 20,29.8 20.1,29.9 24.3,29.9 24.6,29.9 25.3,29.9 25.8,30.4 26.7,30.4 U4.Y2@27.2,30.9
  Bottom Layer w0.2: HDR_L1.70@11.2,29.8 v2(12.7,29.8)
EXTEND_B35: HDR_L1.72 U4.AA1 | length 15.4
  Top Layer w0.127: v2(13.3,29) 20.2,29 20.7,29.5 24.3,29.5 24.6,29.5 25.3,29.5 25.7,29.9 U4.AA1@26.2,29.9
  Bottom Layer w0.2: HDR_L1.72@11.2,29 v2(13.3,29)
EXTEND_B36: HDR_L1.74 U4.AB1 | length 15.5
  Top Layer w0.127: v2(12.7,28.2) 19.8,28.2 20.7,29.1 23.4,29.1 23.7,28.8 24.3,28.8 24.6,28.8 26.1,28.8 U4.AB1@26.2,28.9
  Bottom Layer w0.2: HDR_L1.74@11.2,28.2 v2(12.7,28.2)
EXTEND_B37: HDR_L1.76 U4.AB2 | length 17
  Top Layer w0.127: v2(13.3,27.4) 19.4,27.4 20.8,28.8 23.3,28.8 23.7,28.4 24.3,28.4 24.6,28.4 25.7,28.4 26.7,28.4 U4.AB2@27.2,28.9
  Bottom Layer w0.2: HDR_L1.76@11.2,27.4 v2(13.3,27.4)
EXTEND_B38: HDR_L1.78 U4.AC1 | length 15.5
  Top Layer w0.127: v2(12.7,26.6) 20.3,26.6 20.7,27 22.7,27 23.6,27.9 24.3,27.9 24.6,27.9 U4.AC1@26.2,27.9
  Bottom Layer w0.2: HDR_L1.78@11.2,26.6 v2(12.7,26.6)
EXTEND_B39: HDR_L1.80 U4.AC2 | length 16.9
  Top Layer w0.127: v2(13.3,25.8) 19.9,25.8 20.7,26.6 22.7,26.6 23.5,27.4 24.3,27.4 24.6,27.4 26.7,27.4 U4.AC2@27.2,27.9
  Bottom Layer w0.2: HDR_L1.80@11.2,25.8 v2(13.3,25.8)
EXTEND_B40: HDR_L1.82 U4.AD1 | length 16
  Top Layer w0.127: v2(12.7,25) 19.5,25 20.7,26.2 22.9,26.2 23.8,27.1 24.3,27.1 24.6,27.1 25.5,27.1 25.7,26.9 U4.AD1@26.2,26.9
  Bottom Layer w0.2: HDR_L1.82@11.2,25 v2(12.7,25)
EXTEND_B41: HDR_L1.84 U4.AD2 | length 17.1
  Top Layer w0.127: v2(13.3,24.2) 19.3,24.2 20.7,25.6 24.3,25.6 24.6,25.6 25.1,25.6 25.9,26.4 26.7,26.4 U4.AD2@27.2,26.9
  Bottom Layer w0.2: HDR_L1.84@11.2,24.2 v2(13.3,24.2)
EXTEND_B42: HDR_L1.86 U4.Y4 | length 21.3
  Top Layer w0.2: v1(28.7,30.4) U4.Y4@29.2,30.9
  MidLayer1 w0.127: v2(12.7,23.4) 15.2,23.4 21.3,29.5 24.3,29.5 24.6,29.5 25.2,29.5 25.8,30.1 27.3,30.1 27.5,29.9 28.2,29.9 v1(28.7,30.4)
  Bottom Layer w0.2: HDR_L1.86@11.2,23.4 v2(12.7,23.4)
EXTEND_B43: HDR_L1.88 U4.M6 | length 33.4
  Top Layer w0.2: v1(30.7,39.4) U4.M6@31.2,38.9
  MidLayer3 w0.127: v2(13.3,22.6) 14.3,23.6 14.3,33.6 20.6,39.9 24.3,39.9 24.6,39.9 26.4,39.9 30.2,39.9 v1(30.7,39.4)
  Bottom Layer w0.2: HDR_L1.88@11.2,22.6 v2(13.3,22.6)
EXTEND_B44: HDR_L1.90 U4.P6 | length 31.5
  Top Layer w0.2: v1(30.7,36.4) U4.P6@31.2,36.9
  MidLayer3 w0.127: v2(12.7,21.8) 13.3,21.8 14.9,23.4 14.9,32.4 18.4,35.9 24.3,35.9 24.6,35.9 30.2,35.9 v1(30.7,36.4)
  Bottom Layer w0.2: HDR_L1.90@11.2,21.8 v2(12.7,21.8)
EXTEND_B45: HDR_L1.92 U4.T6 | length 31
  Top Layer w0.2: v1(30.7,34.4) U4.T6@31.2,34.9
  MidLayer3 w0.127: v2(13.3,21) 13.3,21.2 15.5,23.4 15.5,32.1 17.3,33.9 24.3,33.9 24.6,33.9 30.2,33.9 v1(30.7,34.4)
  Bottom Layer w0.2: HDR_L1.92@11.2,21 v2(13.3,21)
EXTEND_B46: HDR_L1.94 U4.U6 | length 32.3
  Top Layer w0.2: v1(30.7,33.4) U4.U6@31.2,33.9
  MidLayer3 w0.127: v2(12.7,20.2) 13.6,20.2 14,19.8 14.9,19.8 16.1,21 16.1,31.8 17.2,32.9 24.3,32.9 24.6,32.9 30.2,32.9 v1(30.7,33.4)
  Bottom Layer w0.2: HDR_L1.94@11.2,20.2 v2(12.7,20.2)
EXTEND_B47: HDR_L1.96 U4.V6 | length 29.7
  Top Layer w0.2: v1(30.7,32.4) U4.V6@31.2,32.9
  MidLayer3 w0.127: v2(13.3,19.4) 16.9,19.4 18.6,21.1 18.6,28.1 22.1,31.6 23.6,31.6 23.9,31.9 24.3,31.9 24.6,31.9 30.2,31.9 v1(30.7,32.4)
  Bottom Layer w0.2: HDR_L1.96@11.2,19.4 v2(13.3,19.4)
EXTEND_B48: HDR_L1.98 U4.W6 | length 29.7
  Top Layer w0.2: v1(30.7,31.4) U4.W6@31.2,31.9
  MidLayer3 w0.127: v2(12.7,18.6) 17.2,18.6 19.2,20.6 19.2,27.8 22.3,30.9 24.3,30.9 24.6,30.9 30.2,30.9 v1(30.7,31.4)
  Bottom Layer w0.2: HDR_L1.98@11.2,18.6 v2(12.7,18.6)
EXTEND_B49: HDR_L1.100 U4.Y6 | length 29.6
  Top Layer w0.2: v1(30.7,30.4) U4.Y6@31.2,30.9
  MidLayer3 w0.127: v2(13.3,17.8) 17.2,17.8 19.8,20.4 19.8,27.5 22.2,29.9 24.3,29.9 24.6,29.9 30.2,29.9 v1(30.7,30.4)
  Bottom Layer w0.2: HDR_L1.100@11.2,17.8 v2(13.3,17.8)
EXTEND_C0: HDR_T1.89 U4.N20 | length 37.8
  Top Layer w0.178: U4.N20@45.2,37.9 v1(45.7,38.4)
  MidLayer4 w0.127: v1@45.75,38.4 46.2,38.9 52.8,38.9 53.1,38.9 56.218,38.9 59.918,42.6 61.3,42.6 63.154,44.454 63.154,46.664 62.608,47.21 62.608,54.597 63.7,55.689 v2(63.7,57.9)
  Bottom Layer w0.2: v2(63.7,57.9) HDR_T1.89@63.7,59.4 v2(63.7,57.9)
EXTEND_C1: HDR_T1.87 U4.M20 | length 35.3
  Top Layer w0.178: U4.M20@45.2,38.9 v1(45.7,39.4)
  MidLayer4 w0.127: v1(45.7,39.4) 46.2,39.9 52.8,39.9 53.1,39.9 56.859,39.9 59.859,42.9 61.2,42.9 62.9,44.6 62.9,46.559 62.354,47.105 62.354,54.826 62.9,55.372 v2(62.9,57.3)
  Bottom Layer w0.2: v2(62.9,57.3) HDR_T1.87@62.9,59.4
EXTEND_C2: HDR_T1.85 U4.L20 | length 34.3
  Top Layer w0.178: U4.L20@45.2,39.9 v1(45.7,40.4)
  MidLayer4 w0.127: v1(45.7,40.4) 46.1,40.9 50,40.9 52.8,40.9 53.1,40.9 57.5,40.9 60,43.4 61.3,43.4 62.6,44.7 62.6,46.5 62.1,47 v2(62.1,57.9)
  Bottom Layer w0.2: v2(62.1,57.9) HDR_T1.85@62.1,59.4
EXTEND_C3: HDR_T1.83 U4.K20 | length 31.8
  Top Layer w0.178: U4.K20@45.2,40.9 v1(45.7,41.4)
  MidLayer4 w0.127: v1(45.7,41.4) 46.2,41.9 52.8,41.9 53.1,41.9 57.5,41.9 60.879,45.279 61.3,45.7 v2(61.3,57.3)
  Bottom Layer w0.2: v2(61.3,57.3) HDR_T1.83@61.3,59.4
EXTEND_C4: HDR_T1.81 U4.N21 | length 32.3
  Top Layer w0.2: U4.N21@46.2,37.9 v1(46.7,38.4)
  MidLayer3 w0.127: v1(46.7,38.4) 47.2,38.9 52.8,38.9 53.1,38.9 55.5,38.9 57.5,40.9 57.5,51.7 60.5,54.7 v2(60.5,57.9)
  Bottom Layer w0.2: v2(60.5,57.9) HDR_T1.81@60.5,59.4
EXTEND_C5: HDR_T1.79 U4.M21 | length 30.8
  Top Layer w0.2: U4.M21@46.2,38.9 v1(46.7,39.4)
  MidLayer3 w0.127: v1(46.7,39.4) 47.2,39.9 51,39.9 52.8,39.9 53.1,39.9 55.2,39.9 57.2,41.9 57.2,54.8 v2(59.7,57.3)
  Bottom Layer w0.2: v2(59.7,57.3) HDR_T1.79@59.7,59.4
EXTEND_C6: HDR_T1.77 U4.L21 | length 29.7
  Top Layer w0.2: U4.L21@46.2,39.9 v1(46.7,40.4)
  MidLayer3 w0.127: v1(46.7,40.4) 47.2,40.9 52.8,40.9 53.1,40.9 55.7,40.9 56.9,42.1 56.9,55.1 58.9,57.1 v2(58.9,57.9)
  Bottom Layer w0.2: v2(58.9,57.9) HDR_T1.77@58.9,59.4
EXTEND_C7: HDR_T1.75 U4.K21 | length 27.7
  Top Layer w0.2: U4.K21@46.2,40.9 v1(46.7,41.4)
  MidLayer3 w0.127: v1(46.7,41.4) 47.2,41.9 52.8,41.9 53.1,41.9 54.5,41.9 56.6,44 56.6,55.8 v2(58.1,57.3)
  Bottom Layer w0.2: v2(58.1,57.3) HDR_T1.75@58.1,59.4
EXTEND_C8: HDR_T1.73 U4.J21 | length 26.7
  Top Layer w0.2: U4.J21@46.2,41.9 v1(46.7,42.4)
  MidLayer3 w0.127: v1(46.7,42.4) 47.2,42.9 52.8,42.9 53.1,42.9 55,42.9 56.3,44.2 56.3,56.2 57.3,57.2 v2(57.3,57.9)
  Bottom Layer w0.2: v2(57.3,57.9) HDR_T1.73@57.3,59.4
EXTEND_C9: HDR_T1.71 U4.H21 | length 25.6
  Top Layer w0.2: U4.H21@46.2,42.9 v1(46.7,43.4)
  MidLayer3 w0.127: v1(46.7,43.4) 47.2,43.9 52.8,43.9 53.1,43.9 55.5,43.9 56,44.4 56,56.8 v2(56.5,57.3)
  Bottom Layer w0.2: v2(56.5,57.3) HDR_T1.71@56.5,59.4
EXTEND_C10: HDR_T1.69 U4.J20 | length 27.1
  Top Layer w0.2: U4.J20@45.2,41.9 v1(45.7,42.4)
  MidLayer4 w0.127: v1(45.7,42.4) 46.2,42.9 52.8,42.9 53.1,42.9 55.1,42.9 55.7,43.5 v2(55.7,57.9)
  Bottom Layer w0.2: v2(55.7,57.9) HDR_T1.69@55.7,59.4
EXTEND_C11: HDR_T1.67 U4.H20 | length 25.4
  Top Layer w0.2: U4.H20@45.2,42.9 v1(45.7,43.4)
  MidLayer4 w0.127: v1(45.7,43.4) 46.2,43.9 47,43.9 47.2,44.1 47.2,51.5 47.2,51.8 47.2,52.3 47.5,52.6 49.7,52.6 50.1,52.2 54.1,52.2 54.9,53 v2(54.9,57.3)
  Bottom Layer w0.2: v2(54.9,57.3) HDR_T1.67@54.9,59.4
EXTEND_C12: HDR_T1.65 U4.C26 | length 14.8
  Top Layer w0.127: U4.C26@51.2,47.9 52.8,47.9 53.1,47.9 53.9,47.9 54.7,48.7 54.7,55.9 54.1,56.5 v2(54.1,57.9)
  Bottom Layer w0.2: v2(54.1,57.9) HDR_T1.65@54.1,59.4
EXTEND_C13: HDR_T1.63 U4.C25 | length 15.6
  Top Layer w0.127: U4.C25@50.2,47.9 50.7,48.4 52.8,48.4 53.1,48.4 53.9,48.4 54.4,48.9 54.4,53 53.3,54.1 v2(53.3,57.3)
  Bottom Layer w0.2: v2(53.3,57.3) HDR_T1.63@53.3,59.4
EXTEND_C14: HDR_T1.61 U4.D24 | length 17.7
  Top Layer w0.2: U4.D24@49.2,46.9 v1(49.7,47.4)
  MidLayer1 w0.127: v1(49.7,47.4) 50,47.7 52.8,47.7 53.1,47.7 53.8,47.7 54.4,48.3 54.4,53 52.5,54.9 v2(52.5,57.9)
  Bottom Layer w0.2: v2(52.5,57.9) HDR_T1.61@52.5,59.4
EXTEND_C15: HDR_T1.59 U4.B23 | length 11.9
  Top Layer w0.127: U4.B23@48.2,48.9 48.7,49.4 48.7,50.4 49.4,51.1 49.4,51.5 49.4,51.8 49.4,55 v2(51.7,57.3)
  Bottom Layer w0.2: v2(51.7,57.3) HDR_T1.59@51.7,59.4
EXTEND_C16: HDR_T1.57 U4.C24 | length 17.1
  Top Layer w0.2: U4.C24@49.2,47.9 v1(49.7,48.4)
  MidLayer1 w0.127: v1(49.7,48.4) 52.8,48.4 53.1,48.4 53.6,48.4 54,48.8 54,51.1 52.6,52.5 52.6,53.4 50.9,55.1 v2(50.9,57.9)
  Bottom Layer w0.2: v2(50.9,57.9) HDR_T1.57@50.9,59.4
EXTEND_C17: HDR_T1.55 U4.C23 | length 12.3
  Top Layer w0.2: U4.C23@48.2,47.9 v1(48.7,48.4)
  MidLayer1 w0.127: v1(48.7,48.4) 49.1,48.8 49.1,51.5 49.1,51.8 49.1,56.3 v2(50.1,57.3)
  Bottom Layer w0.2: v2(50.1,57.3) HDR_T1.55@50.1,59.4
EXTEND_C18: HDR_T1.53 U4.D22 | length 13.4
  Top Layer w0.2: U4.D22@47.2,46.9 v1(47.7,47.4)
  MidLayer1 w0.127: v1(47.7,47.4) 48.2,47.9 48.2,48.6 48.7,49.1 48.7,51.5 48.7,51.8 48.7,56.7 49.3,57.3 v2(49.3,57.9)
  Bottom Layer w0.2: v2(49.3,57.9) HDR_T1.53@49.3,59.4
EXTEND_C19: HDR_T1.51 U4.C22 | length 12.9
  Top Layer w0.2: U4.C22@47.2,47.9 v1(47.7,48.4)
  MidLayer1 w0.127: v1(47.7,48.4) 47.7,48.7 48.2,49.2 48.2,50 47.2,51 47.2,51.5 47.2,51.8 47.2,56 v2(48.5,57.3)
  Bottom Layer w0.2: v2(48.5,57.3) HDR_T1.51@48.5,59.4
EXTEND_C20: HDR_T1.49 U4.D21 | length 13.5
  Top Layer w0.2: U4.D21@46.2,46.9 v1(46.7,47.4)
  MidLayer1 w0.127: v1(46.7,47.4) 47.2,47.9 47.2,49.8 46.7,50.3 46.7,51.5 46.7,51.8 46.7,56.4 47.7,57.4 v2(47.7,57.9)
  Bottom Layer w0.2: v2(47.7,57.9) HDR_T1.49@47.7,59.4
EXTEND_C21: HDR_T1.47 U4.C21 | length 12.2
  Top Layer w0.2: U4.C21@46.2,47.9 v1(46.7,48.4)
  MidLayer1 w0.127: v1(46.7,48.4) 46.7,49.8 46.2,50.3 46.2,51.5 46.2,51.8 46.2,56.6 v2(46.9,57.3)
  Bottom Layer w0.2: v2(46.9,57.3) HDR_T1.47@46.9,59.4
EXTEND_C22: HDR_T1.45 U4.D20 | length 13.2
  Top Layer w0.2: U4.D20@45.2,46.9 v1(45.7,47.4)
  MidLayer1 w0.127: v1(45.7,47.4) 46.2,47.9 46.2,49.8 45.8,50.2 45.8,51.5 45.8,51.8 45.8,57 46.1,57.3 v2(46.1,57.9)
  Bottom Layer w0.2: v2(46.1,57.9) HDR_T1.45@46.1,59.4
EXTEND_C23: HDR_T1.43 U4.D19 | length 13.3
  Top Layer w0.2: U4.D19@44.2,46.9 v1(44.7,47.4)
  MidLayer1 w0.127: v1(44.7,47.4) 45.2,47.9 45.2,48.7 45.7,49.2 45.7,49.8 45.4,50.1 45.4,51.5 45.4,51.8 45.4,57.2 v2(45.3,57.3)
  Bottom Layer w0.2: v2(45.3,57.3) HDR_T1.43@45.3,59.4
EXTEND_C24: HDR_T1.41 U4.C19 | length 12.2
  Top Layer w0.2: U4.C19@44.2,47.9 v1(44.7,48.4)
  MidLayer1 w0.127: v2(44.5,57.9) 44.5,57.3 45,56.8 45,51.8 45,51.5 45,49.9 45.2,49.7 45.2,49.2 44.7,48.7 v1(44.7,48.4)
  Bottom Layer w0.2: v2(44.5,57.9) HDR_T1.41@44.5,59.4
EXTEND_C25: HDR_T1.39 U4.D18 | length 13.4
  Top Layer w0.2: U4.D18@43.2,46.9 v1(43.7,47.4)
  MidLayer1 w0.127: v1(43.7,47.4) 44.2,47.9 44.2,50.2 43.7,50.7 43.7,51.5 43.7,51.8 43.7,52.5 43.4,52.8 43.4,57 v2(43.7,57.3)
  Bottom Layer w0.2: v2(43.7,57.3) HDR_T1.39@43.7,59.4
EXTEND_C26: HDR_T1.37 U4.C17 | length 11.8
  Top Layer w0.2: U4.C17@42.2,47.9 v1(42.7,48.4)
  MidLayer1 w0.127: v1(42.7,48.4) 42.7,50.8 42.7,51.5 42.7,51.8 42.7,57.2 42.9,57.4 v2(42.9,57.9)
  Bottom Layer w0.2: v2(42.9,57.9) HDR_T1.37@42.9,59.4
EXTEND_C27: HDR_T1.35 U4.D17 | length 13
  Top Layer w0.2: U4.D17@42.2,46.9 v1(42.7,47.4)
  MidLayer1 w0.127: v2(42.1,57.3) 42.2,57.2 42.2,51.8 42.2,51.5 42.2,47.9 v1(42.7,47.4)
  Bottom Layer w0.2: v2(42.1,57.3) HDR_T1.35@42.1,59.4
EXTEND_C28: HDR_T1.33 U4.D16 | length 13
  Top Layer w0.2: U4.D16@41.2,46.9 v1(41.7,47.4)
  MidLayer1 w0.127: v2(41.3,57.9) 41.3,57.2 41.2,57.1 41.2,51.8 41.2,51.5 41.2,47.9 v1(41.7,47.4)
  Bottom Layer w0.2: v2(41.3,57.9) HDR_T1.33@41.3,59.4
EXTEND_C29: HDR_T1.31 U4.C14 | length 14.5
  Top Layer w0.2: U4.C14@39.2,47.9 v1(39.7,48.4)
  MidLayer4 w0.127: v1(39.7,48.4) 37.668,50.432 37.668,55.829 38.176,56.337 39.537,56.337 v2(40.5,57.3)
  Bottom Layer w0.2: v2(40.5,57.3) HDR_T1.31@40.5,59.4
EXTEND_C30: HDR_T1.29 U4.D15 | length 13.1
  Top Layer w0.2: U4.D15@40.2,46.9 v1(40.7,47.4)
  MidLayer1 w0.127: v2(39.7,57.9) 39.7,54.102 40.2,53.602 40.2,47.9 v1(40.7,47.4)
  Bottom Layer w0.2: v2(39.7,57.9) HDR_T1.29@39.7,59.4
EXTEND_C31: HDR_T1.27 U4.D13 | length 13.4
  Top Layer w0.2: v1(37.7,47.4) U4.D13@38.2,46.9
  MidLayer1 w0.127: v1(37.7,47.4) 38.2,47.9 38.2,48.7 38,48.9 38,51.5 38,51.8 38,56.4 v2(38.9,57.3)
  Bottom Layer w0.2: v2(38.9,57.3) HDR_T1.27@38.9,59.4
EXTEND_C32: HDR_T1.25 U4.C13 | length 11.9
  Top Layer w0.2: v1(37.7,48.4) U4.C13@38.2,47.9
  MidLayer1 w0.127: v1(37.7,48.4) 37.7,51.5 37.7,51.8 37.7,57 38.1,57.4 v2(38.1,57.9)
  Bottom Layer w0.2: v2(38.1,57.9) HDR_T1.25@38.1,59.4
EXTEND_C33: HDR_T1.23 U4.C12 | length 12
  Top Layer w0.2: v1(36.7,48.4) U4.C12@37.2,47.9
  MidLayer1 w0.127: v1(36.7,48.4) 37.2,48.9 37.2,51.5 37.2,51.8 37.2,57.2 v2(37.3,57.3)
  Bottom Layer w0.2: v2(37.3,57.3) HDR_T1.23@37.3,59.4
EXTEND_C34: HDR_T1.21 U4.D11 | length 13.4
  Top Layer w0.2: v1(35.7,47.4) U4.D11@36.2,46.9
  MidLayer1 w0.127: v1(35.7,47.4) 36.2,47.9 36.2,51.596 36.9,52.296 36.9,57 36.5,57.4 v2(36.5,57.9)
  Bottom Layer w0.2: v2(36.5,57.9) HDR_T1.21@36.5,59.4
EXTEND_C35: HDR_T1.19 U4.D10 | length 13
  Top Layer w0.2: v1(34.7,47.4) U4.D10@35.2,46.9
  MidLayer1 w0.127: v1(34.7,47.4) 35.2,47.9 35.2,51.5 35.2,51.8 35.2,56.7 v2(35.7,57.2)
  Bottom Layer w0.2: v2@35.7,57.3 HDR_T1.19@35.7,59.4
EXTEND_C36: HDR_T1.17 U4.C10 | length 11.8
  Top Layer w0.2: v1(34.7,48.4) U4.C10@35.2,47.9
  MidLayer1 w0.127: v1(34.7,48.4) 34.7,50.8 34.7,51.5 34.7,51.8 34.7,55.9 34.9,56.1 v2(34.9,57.9)
  Bottom Layer w0.2: v2(34.9,57.9) HDR_T1.17@34.9,59.4
EXTEND_C37: HDR_T1.15 U4.D9 | length 13.3
  Top Layer w0.2: v1(33.7,47.4) U4.D9@34.2,46.9
  MidLayer1 w0.127: v1(33.7,47.4) 33.2,47.9 33.2,48.7 33.7,49.2 33.7,51.5 33.7,51.8 33.7,52.4 34.1,52.8 v2(34.1,57.3)
  Bottom Layer w0.2: v2(34.1,57.3) HDR_T1.15@34.1,59.4
EXTEND_C38: HDR_T1.13 U4.C8 | length 12.2
  Top Layer w0.2: v1(32.7,48.4) U4.C8@33.2,47.9
  MidLayer1 w0.127: v1(32.7,48.4) 32.7,48.7 33.2,49.2 33.2,51.5 33.2,51.8 33.2,52.3 32.9,52.6 32.9,56.7 33.3,57.1 v2(33.3,57.9)
  Bottom Layer w0.2: v2(33.3,57.9) HDR_T1.13@33.3,59.4
EXTEND_C39: HDR_T1.11 U4.D8 | length 13.2
  Top Layer w0.2: v1(32.7,47.4) U4.D8@33.2,46.9
  MidLayer1 w0.127: v2(32.5,57.3) 32.5,51.8 32,51.3 32,48.8 32.2,48.6 32.2,47.9 v1(32.7,47.4)
  Bottom Layer w0.2: v2(32.5,57.3) HDR_T1.11@32.5,59.4
EXTEND_C40: HDR_T1.12 U4.B10 | length 23.9
  Top Layer w0.127: v2(32.5,68.3) 32.5,62.6 36,59.1 36,57.7 36.3,57.4 36.3,57 35.5,56.2 35.5,53.1 34.7,52.3 34.7,51.8 34.7,51.5 34.7,49.4 U4.B10@35.2,48.9
  Bottom Layer w0.2: HDR_T1.12@32.5,66.2 v2(32.5,68.3)
EXTEND_C41: HDR_T1.9 U4.C7 | length 12
  Top Layer w0.2: v1(31.7,48.4) U4.C7@32.2,47.9
  MidLayer1 w0.127: v1(31.7,48.4) 31.7,51.4 32.1,51.8 32.1,56.4 31.7,56.8 v2(31.7,57.9)
  Bottom Layer w0.2: v2(31.7,57.9) HDR_T1.9@31.7,59.4
EXTEND_C42: HDR_T1.10 U4.A9 | length 21.3
  Top Layer w0.127: v2(31.7,67.7) 31.7,62.8 35.4,59.1 35.4,57.7 35.2,57.5 35.2,53.2 34.2,52.2 34.2,51.8 34.2,51.5 U4.A9@34.2,49.9
  Bottom Layer w0.2: HDR_T1.10@31.7,66.2 v2(31.7,67.7)
EXTEND_C43: HDR_T1.7 U4.D7 | length 13.3
  Top Layer w0.2: v1(31.7,47.4) U4.D7@32.2,46.9
  MidLayer1 w0.127: v2@30.8,57.2 v2(30.9,57.3) 30.9,56.6 30.8,56.5 30.8,49.5 31.2,49.1 31.2,47.9 v1(31.7,47.4)
  Bottom Layer w0.2: v2(30.9,57.3) HDR_T1.7@30.9,59.4
EXTEND_C44: HDR_T1.8 U4.B9 | length 23.7
  Top Layer w0.127: v2(30.9,68.3) 30.9,62.6 34.4,59.1 34.4,57.7 34.7,57.4 34.7,53.1 33.7,52.1 33.7,51.8 33.7,51.5 33.7,49.4 U4.B9@34.2,48.9
  Bottom Layer w0.2: HDR_T1.8@30.9,66.2 v2(30.9,68.3)
EXTEND_C45: HDR_T1.5 U4.C6 | length 12
  Top Layer w0.2: v1(30.7,48.4) U4.C6@31.2,47.9
  MidLayer1 w0.127: v2(30.1,57.9) 30.1,56.6 30.5,56.2 30.5,49.3 30.7,49.1 v1(30.7,48.4)
  Bottom Layer w0.2: v2(30.1,57.9) HDR_T1.5@30.1,59.4
EXTEND_C46: HDR_T1.6 U4.A8 | length 23.1
  Top Layer w0.127: v2(30.1,67.7) 30.1,62.8 33.8,59.1 33.8,57.7 33.5,57.4 33.5,56 34.1,55.4 34.1,52.9 33.2,52 33.2,51.8 33.2,51.5 U4.A8@33.2,49.9
  Bottom Layer w0.2: HDR_T1.6@30.1,66.2 v2(30.1,67.7) HDR_T1.6@30.1,66.2
EXTEND_C47: HDR_T1.3 U4.D6 | length 13.3
  Top Layer w0.2: v1(30.7,47.4) U4.D6@31.2,46.9
  MidLayer1 w0.127: v2(29.3,57.3) 29.3,56.8 30.2,55.9 30.2,52 30.2,51.3 30.2,47.9 v1(30.7,47.4)
  Bottom Layer w0.2: v2(29.3,57.3) HDR_T1.3@29.3,59.4
EXTEND_C48: HDR_T1.4 U4.A7 | length 23.9
  Top Layer w0.127: v2(29.3,68.3) 29.3,62.6 32.8,59.1 32.8,57.7 33.1,57.4 33.1,55.8 32.9,55.6 32.2,54.9 32.2,51.8 32.2,51.5 U4.A7@32.2,49.9
  Bottom Layer w0.2: 29.3,67.7 HDR_T1.4@29.3,66.2 v2(29.3,68.3)
EXTEND_C49: HDR_T1.2 U4.B7 | length 22.2
  Top Layer w0.127: v2(28.5,67.7) 28.5,62.8 32.2,59.1 32.2,57.7 31.9,57.4 31.9,51.2 31.7,51 31.7,49.4 U4.B7@32.2,48.9
  Bottom Layer w0.2: HDR_T1.2@28.5,66.2 v2(28.5,67.7)
FB: R24.2 R25.1 U5.8 | length 3.1
  Top Layer w0.2: U5.8@72.2,45.9 U5.8@72.2,45.929
  Top Layer w0.3: R24.2@71.338,47.4 72.1,47.4 ; U5.8@72.1,45.9 72.1,45.929 72.1,47.4 ; R25.1@72.862,47.4 72.1,47.4
FPGA_CCLK: HDR_T1.66 R17.1 | length 54.5
  MidLayer3 w0.127: v2(54.1,67.7) 53.2,67.7 52.8,68.1 52.8,68.6 53.4,69.2 62.9,69.2 64.2,67.9 64.2,57.7 63.7,57.2 63.7,55.9 58.654,50.854 58.654,39.554 v1(57.7,38.6)
  Bottom Layer w0.127: R17.1@52.451,40.688 53.112,40.688 53.4,40.4 53.4,39.6 53.6,39.4 57.4,39.4 57.7,39.1 v1(57.7,38.6)
  Bottom Layer w0.2: HDR_T1.66@54.1,66.2 v2(54.1,67.7)
FPGA_CLK: HDR_B1.2 U4.AE14 | length 23.5
  Top Layer w0.127: U4.AE14@39.2,25.9 39.7,25.4 39.7,22.2 39.9,22 v1(39.9,19.1)
  MidLayer1 w0.127: v2(28.5,16.9) 29.4,16 39.5,16 40.2,16.7 40.2,17.1 40,17.3 40,18.575 39.9,18.675 v1(39.9,19.1)
  Bottom Layer w0.2: HDR_B1.2@28.5,15.4 v2(28.5,16.9)
FPGA_CLK1: HDR_T1.90 U4.C15 | length 59.8
  Top Layer w0.2: U4.C15@40.2,47.9 v1(40.7,48.4)
  MidLayer4 w0.127: v1(37.6,71) 41.1,71 42.1,70 42.1,58 39.954,55.855 38.355,55.855 38.1,55.6 38.1,51 v1(40.7,48.4)
  Bottom Layer w0.127: v1(37.6,71) 57.4,71 59.1,69.3 62,69.3 63.7,67.6 HDR_T1.90@63.7,66.2
FPGA_DIN: HDR_T1.64 U4.G12 | length 41
  Top Layer w0.203: U4.G12@37.2,43.9 v1(37.7,44.4)
  MidLayer1 w0.127: v1(37.7,44.4) 38.5,45.2 38.5,48.768 38.254,49.014 38.254,54.078 38.43,54.254 38.917,54.254 39.4,54.737 39.4,57.5 39.2,57.7 39.2,58.306 39.494,58.6 51.683,58.6 53.3,60.216 v1(53.3,68.3)
  Bottom Layer w0.203: HDR_T1.64@53.3,66.2 v1(53.3,68.3)
FPGA_DONE: HDR_T1.74 NT2.2 R12.1 R16.1 | length 101.7
  MidLayer2 w0.127: v1(55.2,22.8) 54.2,21.8 54.2,17.5 59.5,12.2 59.5,6.9 v1(58.9,6.3)
  MidLayer3 w0.127: v1(37.3,6.3) 37.6,6.6 58.6,6.6 v1(58.9,6.3)
  MidLayer4 w0.127: v2(57.3,67.7) 57.3,58.8 58.7,57.4 58.7,47.2 v1(59.7,46.2)
  Bottom Layer w0.127: NT2.2@36.6,6.575 37.025,6.575 v1(37.3,6.3) ; R16.1@52.451,42.938 52.451,45.951 52.7,46.2 v1(59.7,46.2) 59.7,44.2 58.55,43.05 58.55,38.35 56.8,36.6 56.8,25.7 55.538,24.438 R12.1@55.538,23.5 ; v1(55.2,22.8) 55.538,23.138 R12.1@55.538,23.5 ; R12.1@55.5,23.5 R12.1@55.538,23.5
  Bottom Layer w0.2: HDR_T1.74@57.3,66.2 v2(57.3,67.7)
FPGA_ID0: HDR_T1.42 NT3.1
FPGA_ID1: HDR_T1.40 NT5.1
FPGA_ID2: HDR_T1.38 NT6.1
FPGA_ID3: HDR_T1.36 NT7.1
FPGA_INIT: HDR_T1.68 R9.1 U4.G15 | length 49.6
  Top Layer w0.203: U4.G15@40.2,43.9 v1(40.7,44.4)
  MidLayer1 w0.203: v1(48.7,76.2) 48.7,74.5 v1(54.9,68.3)
  MidLayer2 w0.127: v1(40.7,44.4) 41.2,44.9 41.2,45.8 41.3,45.9 50.2,45.9 55.4,51.1 55.4,57.5 55.1,57.8 55.1,67.3 54.9,67.5 v1(54.9,68.3)
  Bottom Layer w0.203: R9.1@47.738,76.2 v1(48.7,76.2) ; HDR_T1.68@54.9,66.2 v1(54.9,68.3)
FPGA_INSTALLED: HDR_T1.34 NT1.1 | length 1.4
  Bottom Layer w0.2: HDR_T1.34@41.3,66.2 NT1.1@41.3,67.6
FPGA_M0: HDR_T1.60 R14.1 | length 81.2
  Bottom Layer w0.127: R14.1@21.962,22.4 20.9,22.4 20.7,22.6 20.7,46.9 20.3,47.3 20.3,55.3 21.4,56.4 26.4,56.4 26.9,56.9 26.9,68.1 28.4,69.6 51,69.6 51.8,68.8 51.8,68 51.7,67.9 HDR_T1.60@51.7,66.2
FPGA_M1: HDR_T1.58 R13.1 | length 76
  Bottom Layer w0.127: R13.1@21.962,24.6 21.5,24.6 21.3,24.8 21.3,47.1 20.9,47.5 20.9,55.1 21.6,55.8 26.8,55.8 27.5,56.5 27.5,67.7 28.8,69 50.3,69 50.6,68.7 50.6,68 50.9,67.7 HDR_T1.58@50.9,66.2
FPGA_M2: HDR_T1.56 R11.1 | length 79.6
  Top Layer w0.127: v2(50.1,68.4) v2(51.2,68.4)
  Bottom Layer w0.127: R11.1@21.962,23.5 21.155,23.5 21,23.655 21,47 20.6,47.4 20.6,55.2 21.5,56.1 26.6,56.1 27.2,56.7 27.2,67.9 28.6,69.3 50.8,69.3 51.2,68.9 v2(51.2,68.4) ; HDR_T1.56@50.1,66.2 v2@50.1,68.3
FPGA_PROG_CLK: HDR_T1.88
FPGA_PROG_PWR_ON: HDR_T1.86 R4.1 | length 54.5
  Top Layer w0.127: v1(24.7,55.3) 24.7,55.9 v1(24.7,56.9)
  Bottom Layer w0.127: R4.1@24.462,54.5 24.5,54.538 24.5,55.1 v1(24.7,55.3) ; v1(24.7,56.9) 25.6,57.8 25.6,58.1 26,58.5 26,68.4 28.1,70.5 57.3,70.5 58.9,68.9 61.4,68.9 62.1,68.2 HDR_T1.86@62.1,66.2